# Altium PCB TELEX_CORE_LEFT_V2.0.PcbDoc
Units mil, origin at the board's own origin, x right, y up, seen from the top; angles counter-clockwise.
Board outline 1377.95 x 984.25 mil, 4 copper layers (Top Layer, GND, PWR, Bottom Layer), stack 23.756 mil thick; 122 components, 83 nets, 467 pads, 188 vias.
Unrouted connection lines stored in the file: 4.
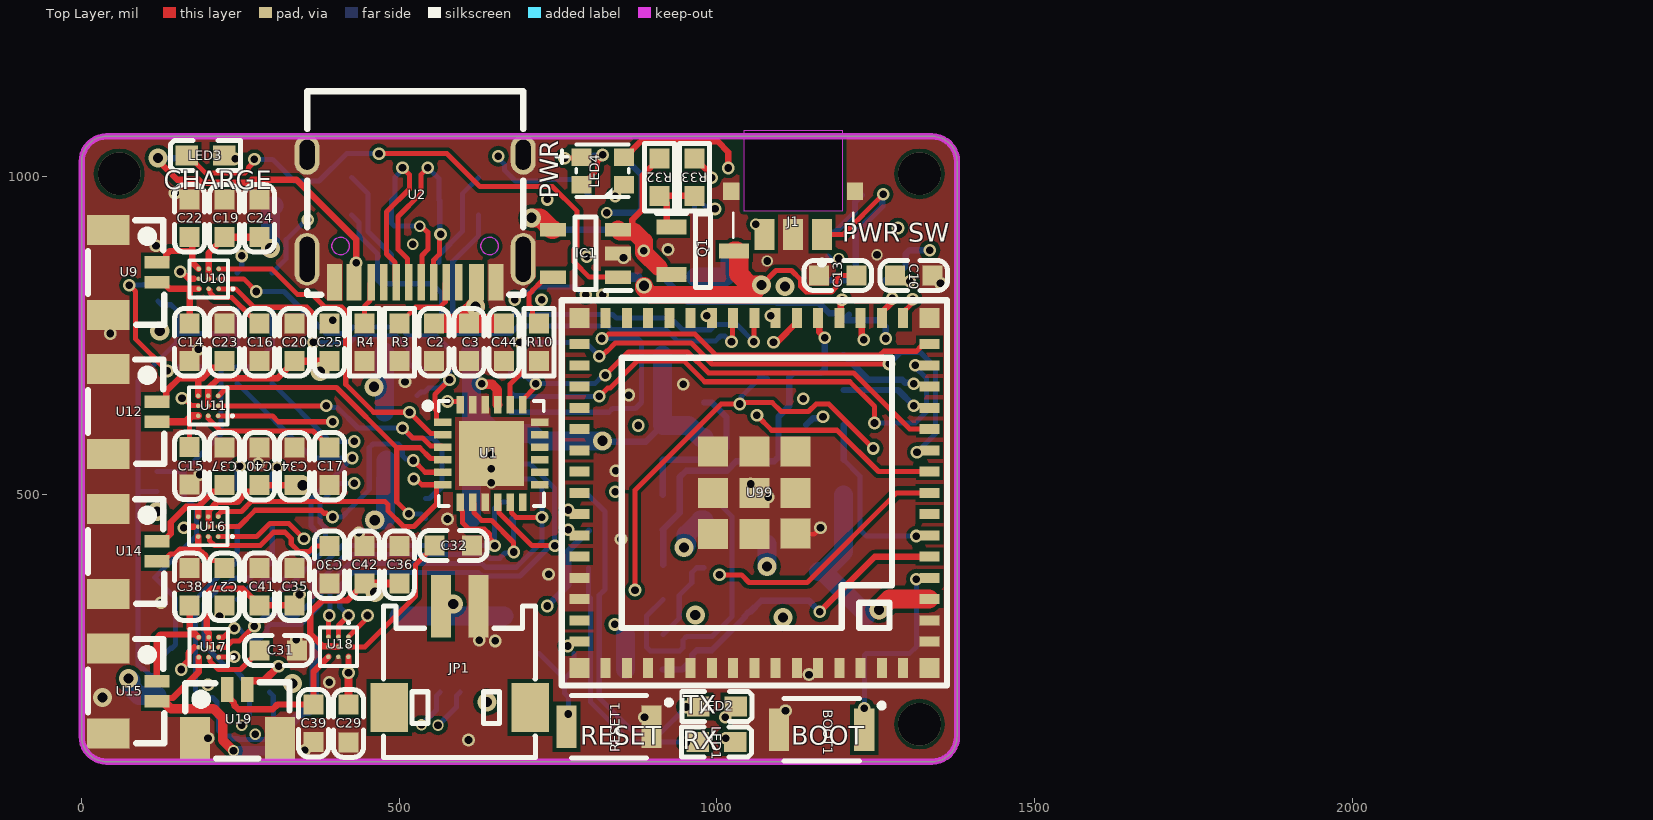
[diagram p0: Top Layer view]
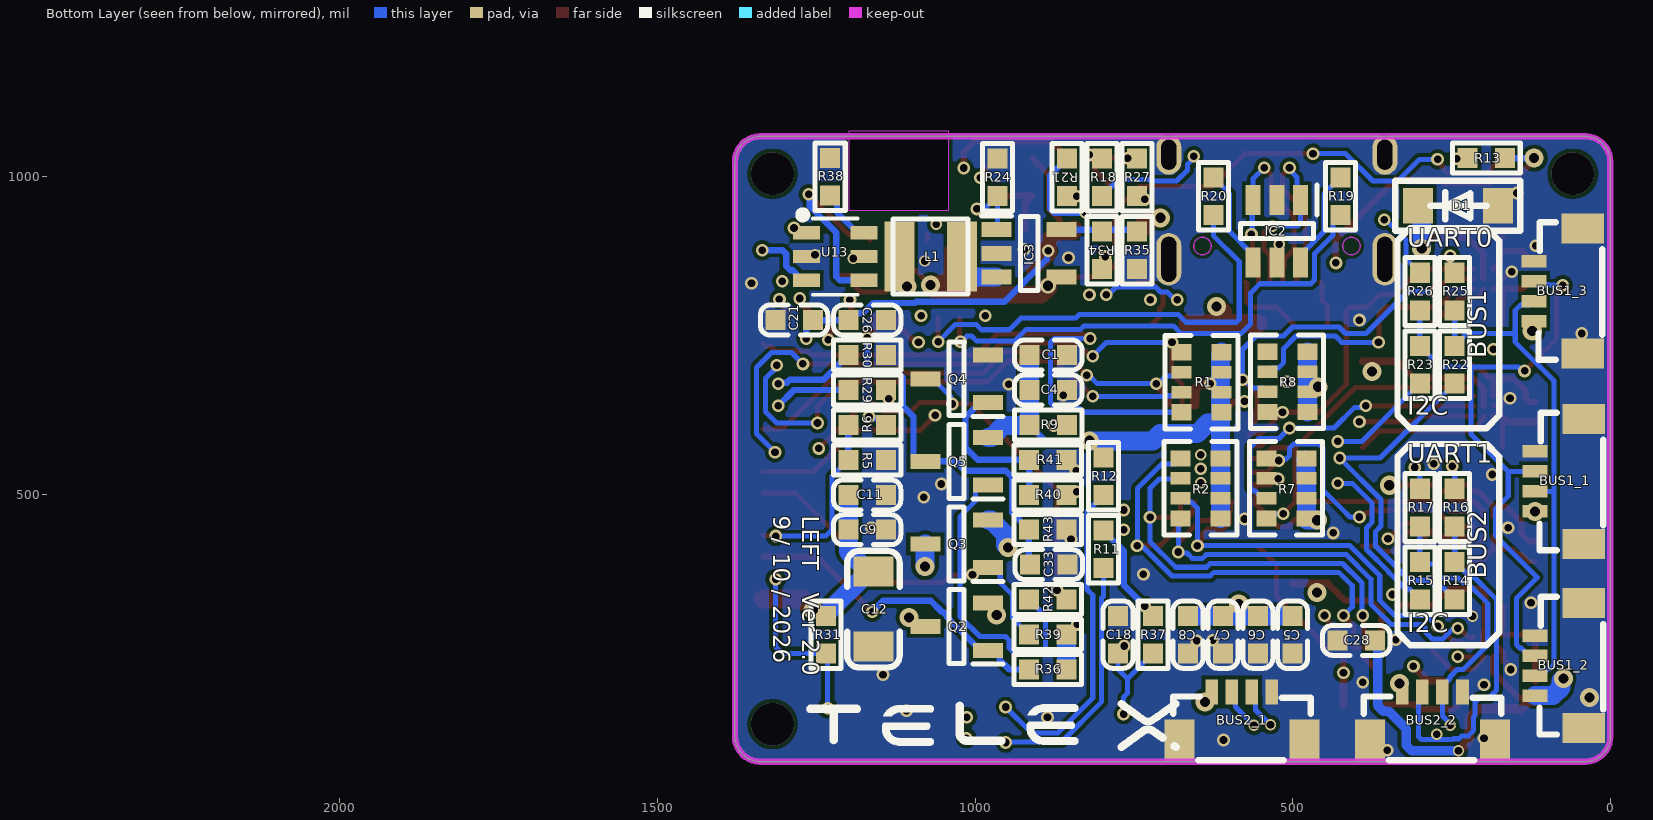
[diagram p1: Bottom Layer view, seen from below]
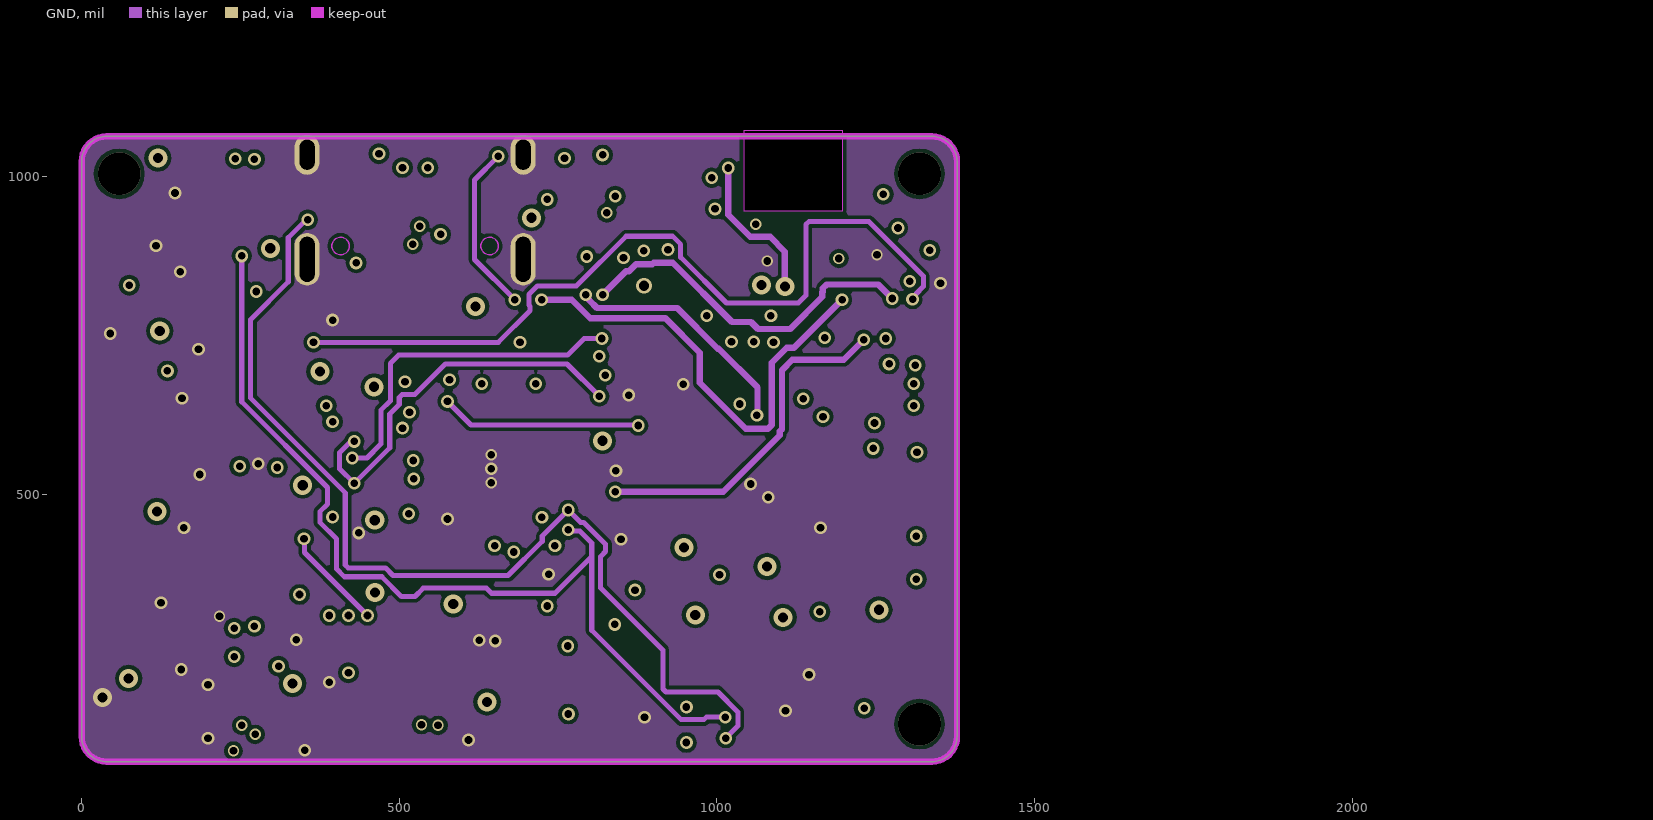
[diagram p2: GND]
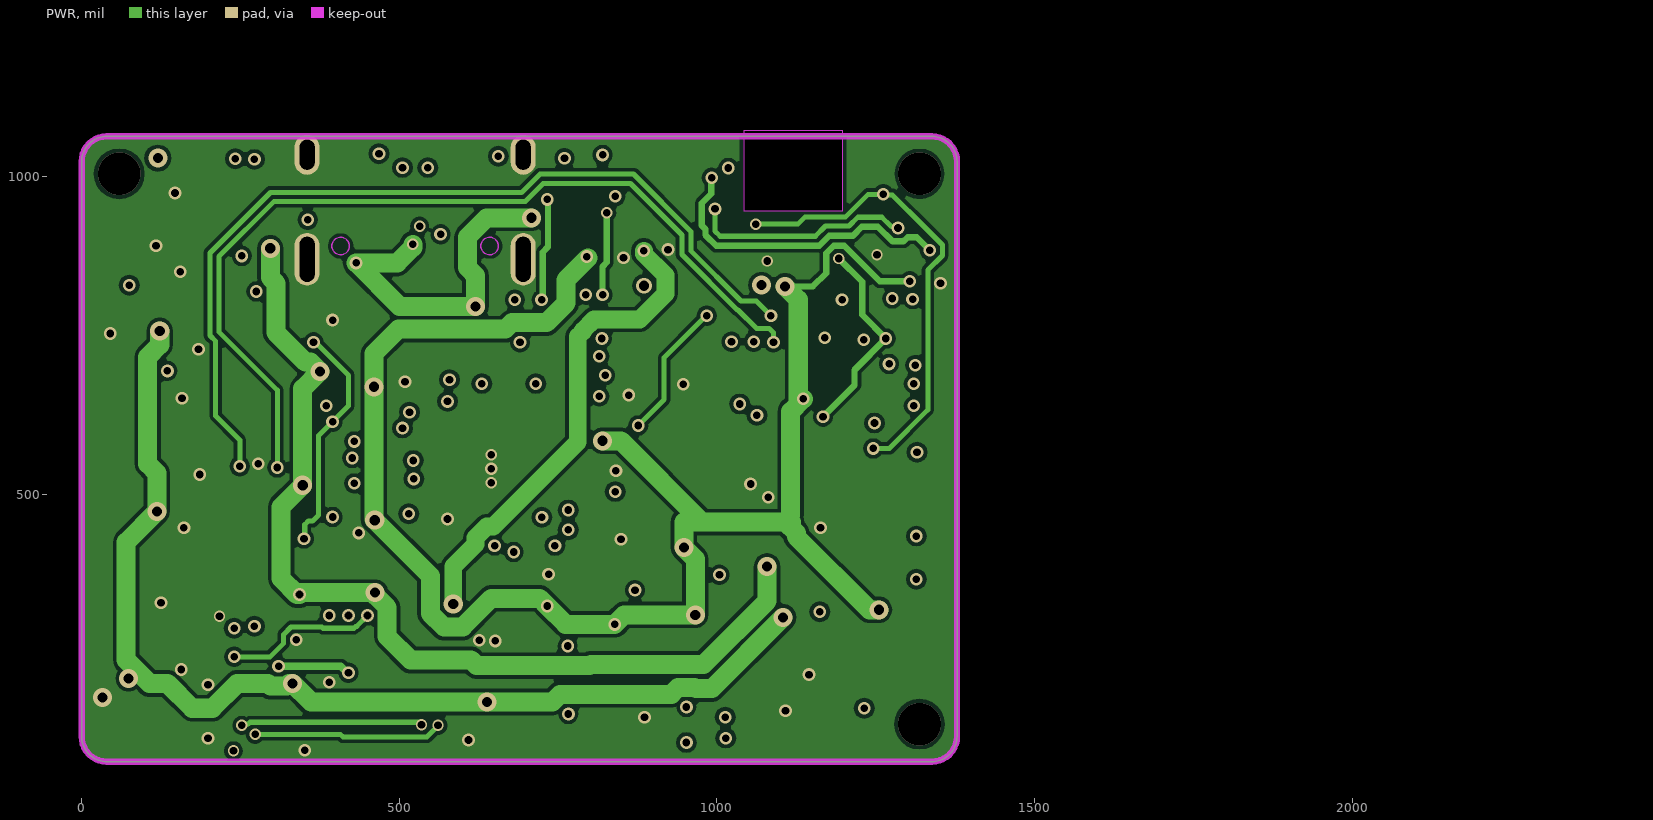
[diagram p3: PWR]
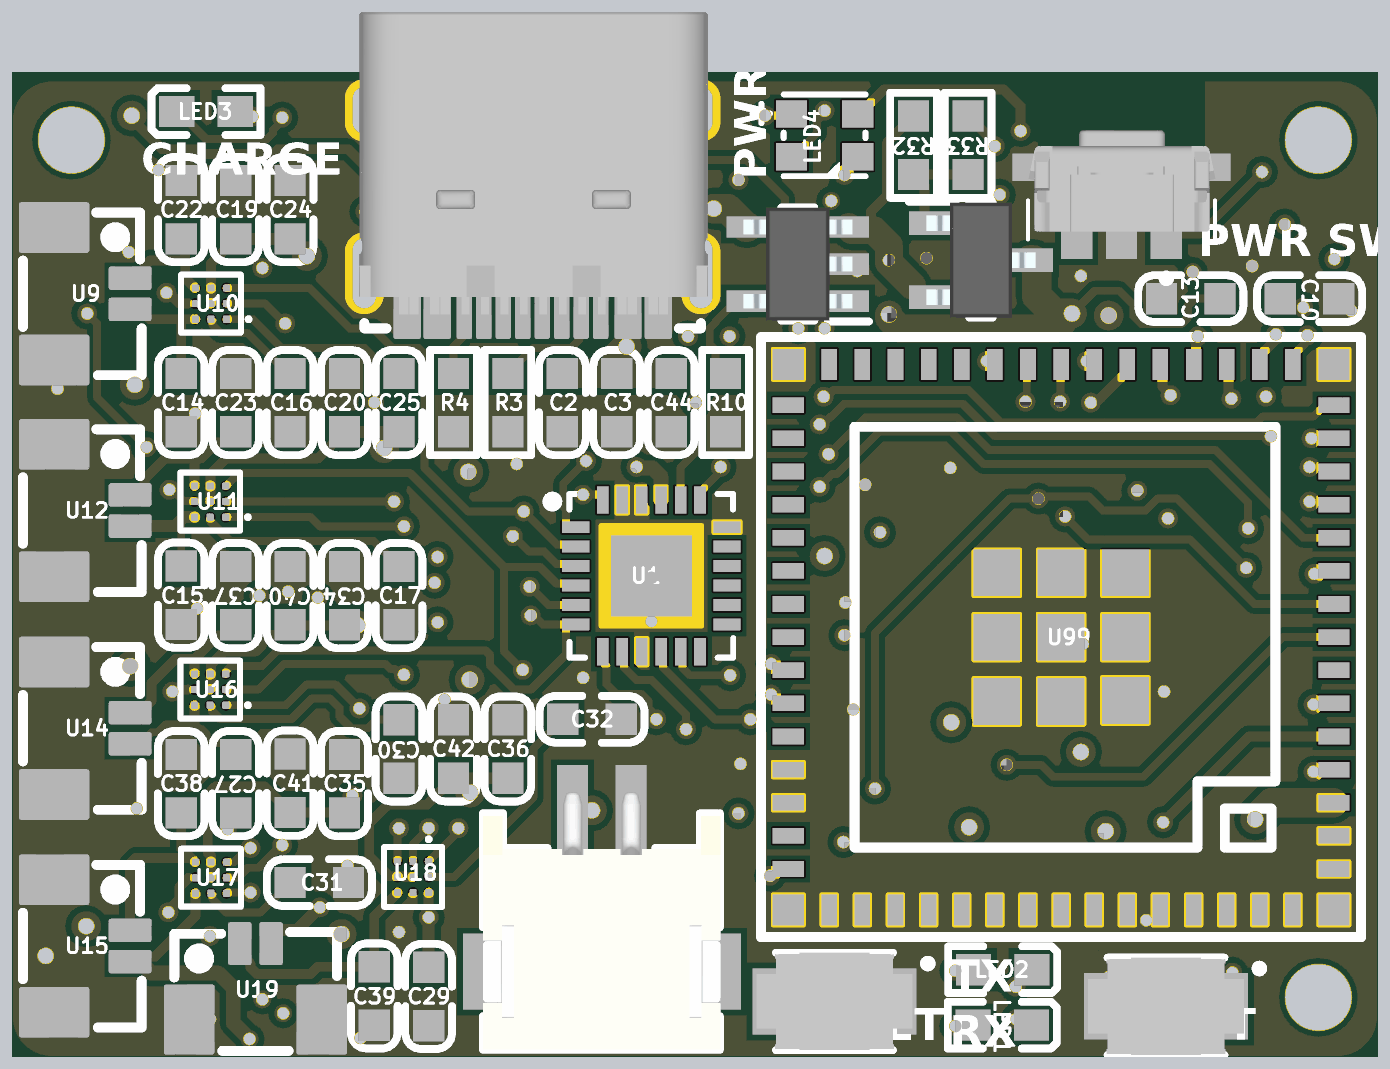
[diagram p4: 3D render of the assembled board from above, using the file's embedded part models]
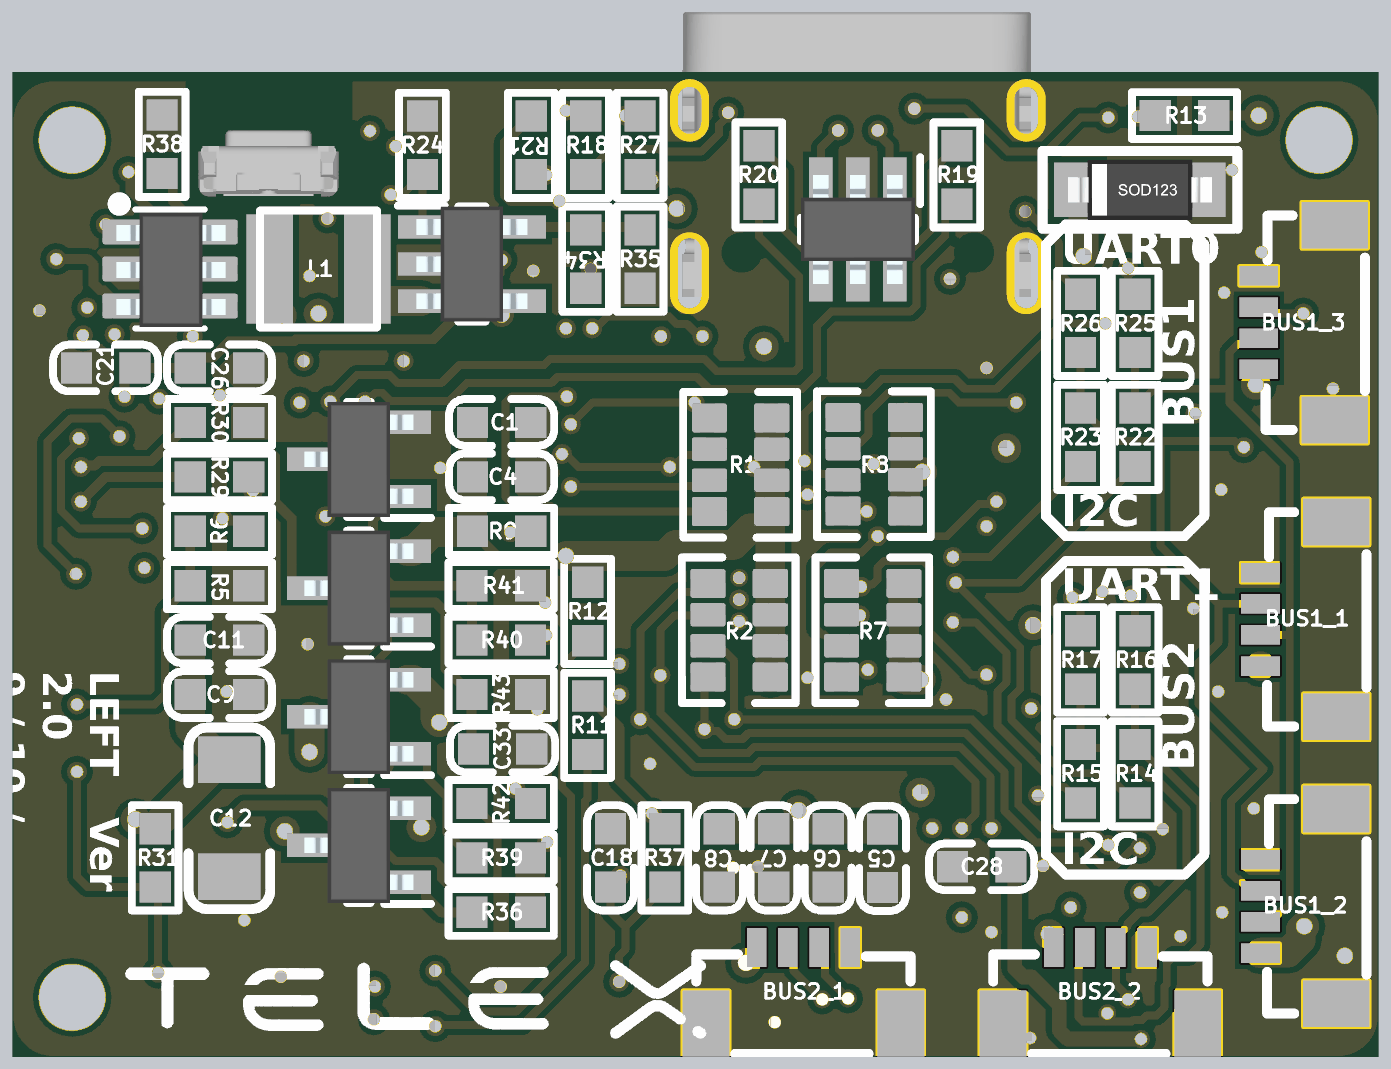
[diagram p5: 3D render of the assembled board from below, using the file's embedded part models]

## Layer stack, top to bottom
Top Solder: solder mask 0.4, Solder Resist, Dk 3.5
Top Layer: signal copper 1.4
Dielectric 2: prepreg 2.8, PP-006, Dk 4.1
GND: signal copper 1.378
Dielectric 1: dielectric 12.6, FR-4, Dk 4.8
PWR: signal copper 1.378
Dielectric 3: prepreg 2.8, PP-006, Dk 4.1
Bottom Layer: signal copper 1.4
Bottom Solder: solder mask 0.4, Solder Resist, Dk 3.5

## Board outline
39.37,79 cw(c39.37,118.37) 0,118.37 0,1023.88 cw(c39.37,1023.88) 39.37,1063.25 1338.58,1063.25 cw(c1338.58,1023.88) 1377.95,1023.88 1377.95,118.37 cw(c1338.58,118.37) 1338.58,79
cut-out: 1042,1072 1042,946 1198,946 1198,1072

## Design rules (kind name [scope] priority, off if disabled: settings)
Clearance [All] p1: gap=6 ignorepadtopadclearanceinfootprint=TRUE except(0: Arc-Text Track-Text SMDPad-Text THPad-Text Via-Text Fill-Text Poly-Text Region-Text Text-Text)
DiffPairsRouting [All] p1: maxlimit=10 minlimit=10 mostfreqgap=10 toplayer_minwidth=5 toplayer_maxwidth=15 toplayer_prefwidth=15 midlayer1_minwidth=5 midlayer1_maxwidth=15 midlayer1_prefwidth=15 midlayer2_minwidth=5 midlayer2_maxwidth=15 midlayer2_prefwidth=15 bottomlayer_minwidth=5 bottomlayer_maxwidth=15 bottomlayer_prefwidth=15 maxuncoupledlength=500
HoleToHoleClearance [All] p1: gap=0 allowstackedmicrovias=TRUE
MinimumSolderMaskSliver [All] p1: minsoldermaskwidth=0
PolygonConnect [All] p1: connectstyle=Direct reliefconductorwidth=10 reliefentries=4 polygonreliefangle="90 Angle" airgapwidth=10
RoutingVias [All] p1: holewidth=28 width=50 viastyle="Through Hole" minholewidth=28 minwidth=50 maxholewidth=28 maxwidth=50
SilkToSilkClearance [All] p1: silktosilkclearance=0
SilkToSolderMaskClearance [IsPad] p1: minsilkscreentomaskgap=0 clearancetoexposedcopper=TRUE
SolderMaskExpansion [All] p1: expansion=0 istentingtop=FALSE
SupplyNets "Schematic Supply Nets_5" [InNet('VDD')] p1: voltage=0.000
SupplyNets "Schematic Supply Nets_4" [InNet('VUSB')] p2: voltage=0.000
SupplyNets "Schematic Supply Nets_3" [InNet('VIN')] p3: voltage=0.000
SupplyNets "Schematic Supply Nets_2" [InNet('+3.3V')] p4: voltage=0.000
SupplyNets "Schematic Supply Nets_1" [InNet('VBAT')] p5: voltage=0.000
SupplyNets "Schematic Supply Nets" [InNet('GND')] p6: voltage=0.000
Width [All] p1: maxlimit=9999 minlimit=5 preferedwidth=10 minimp=50.000000 maximp=50.000000 favimp=50.000000
25 further rules are at their usual default settings.

## Classes and differential pairs
differential pair PROC: +PROC_P -PROC_N
differential pair D: +D_P -D_N

## Components (designator, comment, footprint, x,y, rotation, side; value= is the part's Value field where it differs from the comment)
BOOT1 "B3U-1000P" B3U-1000P 1165,129 r0 top
BUS1_1 "SUH08-4P" WAFER-SUH08-WT-4A-4P-P0.80 80,520 r90 bottom
BUS1_2 "SUH08-4P" WAFER-SUH08-WT-4A-4P-P0.80 80,230 r90 bottom
BUS1_3 "SUH08-4P" WAFER-SUH08-WT-4A-4P-P0.80 81.61,819.75 r90 bottom
BUS2_1 "SUH08-4P" WAFER-SUH08-WT-4A-4P-P0.80 580,150 r180 bottom
BUS2_2 "SUH08-4P" WAFER-SUH08-WT-4A-4P-P0.80 280,150 r180 bottom
C1 "0.1uF" C0603 885,719 r0 bottom
C2 "10nF" C0603 555,739 r90 top
C3 "100nF" C0603 610,739 r90 top
C4 "10uF" C0603 885,664 r0 bottom
C5 "22uF" C0603 500,278.53 r90 bottom
C6 "22uF" C0603 555,279 r90 bottom
C7 "100nF" C0603 610,279 r90 bottom
C8 "22uF" C0603 665,279 r90 bottom
C9 "100nF" C0603 1170,444 r0 bottom
C10 "22uF" C0603 1310,844 r180 top
C11 "10uF" C0603 1170,499 r0 bottom
C12 "100uF" C1206 1160,319 r90 bottom
C13 "10uF" C0603 1190,844 r180 top
C14 "100pF" C0603 170,739 r270 top
C15 "100pF" C0603 170,544.47 r270 top
C16 "0.1uF" C0603 280,739 r270 top
C17 "0.1uF" C0603 390,544 r270 top
C18 "1uF" C0603 775,279 r90 bottom
C19 "10uF" C0603 225,934 r270 top
C20 "10uF" C0603 335,739 r270 top
C21 "100nF" C0603 1285,774 r180 bottom
C22 "100pF" C0603 170,934 r270 top
C23 "100pF" C0603 225,739 r270 top
C24 "0.1uF" C0603 280,934 r270 top
C25 "0.1uF" C0603 390,739 r270 top
C26 "1uF" C0603 1170,774 r0 bottom
C27 "100pF" C0603 225,354 r270 top
C28 "100pF" C0603 400,270 r0 bottom
C29 "100pF" C0603 420,139 r270 top
C30 "0.1uF" C0603 390,389 r270 top
C31 "0.1uF" C0603 309.53,254 r0 top
C32 "0.1uF" C0603 585,419 r0 top
C33 "100nF" C0603 884,389 r0 bottom
C34 "10uF" C0603 335,544 r270 top
C35 "10uF" C0603 335,354 r270 top
C36 "10uF" C0603 500,389 r270 top
C37 "100pF" C0603 225,544 r270 top
C38 "100pF" C0603 170,354 r270 top
C39 "100pF" C0603 365,139.47 r90 top
C40 "0.1uF" C0603 280,544 r270 top
C41 "0.1uF" C0603 280,354.47 r270 top
C42 "0.1uF" C0603 445,389 r270 top
C44 "10uF" C0603 665,739 r90 top
D1 "SSxx" SOD-123FL 240,954 r0 bottom
IC1 "TP4054-42-SOT25-R" SOT95P280X100-5N 793,879 r180 top
IC2 "USBLC6-2SC6" SOT95P280X145-6N 525,914 r270 bottom
IC3 "SY8089AAC" SOT95P285X140-5N 915,879 r180 bottom
J1 "EVPAEDB2A" EVPAEJB2A 1120,929 r180 top
JP1 "HDR-1X2" ZH1.5-WS-2P 595,164 r0 top
L1 "2.2uH" L3030 1070,874 r180 bottom
LED1 "LED_RED" LED0603_RED 999.53,110 r0 top
LED2 "LED_GREEN" LED0603_GREEN 1000,166 r0 top
LED3 "LED_BLUE" LED0603_BLUE 195,1033 r180 top
LED4 "NH-B2020RGBA-HF" NH-B2020RGBA-HF 820,1009 r180 top
Q1 "AO3401A" SOT95P280X125-3N 978,883 r0 top
Q2 "AO3401A" SOT95P280X125-3N 1029.21,291.6 r0 bottom
Q3 "AO3401A" SOT95P280X125-3N 1029.21,421.6 r0 bottom
Q4 "AO3400A" SOT95P280X125-3N 1029.21,681.6 r0 bottom
Q5 "AO3401A" SOT95P280X125-3N 1029.21,551.6 r0 bottom
R1 "4.7kΩ*4" 0603*4 643.5,676.24 r90 bottom
R2 "4.7kΩ*4" 0603*4 645,509 r90 bottom
R3 "5.1K" R0603 500,739 r90 top
R4 "5.1K" R0603 445,739 r90 top
R5 "22K" R0603 1170,554 r180 bottom
R6 "10K" R0603 1170,609 r0 bottom
R7 "4.7kΩ*4" 0603*4 510,509 r90 bottom
R8 "4.7kΩ*4" 0603*4 508.5,676.76 r90 bottom
R9 "10K" R0603 885,609 r0 bottom
R10 "2K" R0603 720,739 r90 top
R11 "1K" R0603 798,413 r270 bottom
R12 "1K" R0603 798,528 r270 bottom
R13 "1K" R0603 195,1029 r0 bottom
R14 "0Ω" R0603 245,364 r90 bottom
R15 "0Ω" R0603 300,364 r90 bottom
R16 "0Ω" R0603 245,479 r90 bottom
R17 "0Ω" R0603 300,479 r90 bottom
R18 "160Ω" R0603 800,999 r90 bottom
R19 "22Ω" R0603 425,969 r90 bottom
R20 "22Ω" R0603 625,969 r90 bottom
R21 "160Ω" R0603 855,999 r270 bottom
R22 "0Ω" R0603 245,704 r90 bottom
R23 "0Ω" R0603 300,704 r90 bottom
R24 "100K" R0603 965,999 r270 bottom
R25 "0Ω" R0603 245,819 r90 bottom
R26 "0Ω" R0603 300,819 r90 bottom
R27 "120Ω" R0603 745,999 r270 bottom
R29 "10K" R0603 1170,664 r180 bottom
R30 "10K" R0603 1170,719 r180 bottom
R31 "10K" R0603 1235,279 r270 bottom
R32 "10K" R0603 910,999 r270 top
R33 "100Ω" R0603 965,999 r90 top
R34 "45.3K" R0603 800,884 r270 bottom
R35 "10K" R0603 745,884 r270 bottom
R36 "10K" R0603 885.47,224 r0 bottom
R37 "10K" R0603 720,279 r270 bottom
R38 "10K" R0603 1228,1000 r270 bottom
R39 "10K" R0603 885.47,279 r0 bottom
R40 "1K" R0603 885.47,499 r180 bottom
R41 "47K" R0603 885.47,554 r0 bottom
R42 "100K" R0603 885.47,334 r0 bottom
R43 "100K" R0603 885.47,444 r0 bottom
RESET1 "B3U-1000P" B3U-1000P 830,134 r0 top
U1 "TCA9548ARGER" TCA9548ARGER 645,564 r270 top
U2 "TYPE-C" TYPE-C-F 525,934 r180 top
U9 "SUH08-2P" WAFER-SUH08-WT-2A-2P-P0.80 80,849 r270 top
U10 "AW86234FCR" DSBGA-9_L1.4-W1.3-R3-C3-P0.40-BL 200,839 r90 top
U11 "AW86234FCR" DSBGA-9_L1.4-W1.3-R3-C3-P0.40-BL 199.25,639 r90 top
U12 "SUH08-2P" WAFER-SUH08-WT-2A-2P-P0.80 80,630 r270 top
U13 "UOV-K20" UOV-K20 1220,874 r270 bottom
U14 "SUH08-2P" WAFER-SUH08-WT-2A-2P-P0.80 80,410 r270 top
U15 "SUH08-2P" WAFER-SUH08-WT-2A-2P-P0.80 80,190 r270 top
U16 "AW86234FCR" DSBGA-9_L1.4-W1.3-R3-C3-P0.40-BL 199.25,449 r90 top
U17 "AW86234FCR" DSBGA-9_L1.4-W1.3-R3-C3-P0.40-BL 200,259 r90 top
U18 "AW86234FCR" DSBGA-9_L1.4-W1.3-R3-C3-P0.40-BL 404.25,259.75 r180 top
U19 "SUH08-2P" WAFER-SUH08-WT-2A-2P-P0.80 245,154 r0 top
U99 "ESP32-S3-MINI-1U" ESP32-S3-MINI-1U 1058.96,502.04 r180 top

## Footprints (in the part's own frame and the unit in brackets; to place one, negate y for a bottom-side part, rotate by r counter-clockwise, add the part's x,y. Pads: shape width x height; smd on the part's side, far side on the other; paste and mask are expansions set on the pad)
0603*4 [mm]
  rect 0.65x0.8 smd paste+0.051: 1(-1.2,-0.8) 4(1.2,-0.8) 5(1.2,0.8) 8(-1.2,0.8)
  rect 0.5x0.8 smd paste+0.051: 2(-0.4,-0.8) 3(0.4,-0.8) 6(0.4,0.8) 7(-0.4,0.8)
  silkscreen extent -1.87,-1.45 1.87,1.47
B3U-1000P [mm] "两脚小龟"
  rect 0.8x1.7 smd: 1(1.7,0) 2(-1.7,0)
  silkscreen extent -1.5,-1.25 2.49,1.25, body extent -2,-1.25 2,1.25, height 1.6
C0603 [mm] "Chip Capacitor, 2-Leads, Body 1.6x0.8mm, IPC Medium Density"
  rect 0.8x0.8 smd: 1(-0.75,0) 2(0.75,0)
  silkscreen extent -1.35,-0.6 1.35,0.6, body extent -1.26,-0.4 1.26,0.4, height 0.5
C1206 [mm] "Chip Capacitor, 2-Leads, Body 3.2x1.6mm, IPC Medium Density"
  rect 1.2x1.6 smd: 1(-1.5,0) 2(1.5,0)
  silkscreen extent -2.33,-1.05 2.33,1.05, body extent -1.6,-0.8 1.6,0.8, height 1
DSBGA-9_L1.4-W1.3-R3-C3-P0.40-BL [mm]
  round 0.184 smd paste-100 mask+0.051: A1(-0.4,-0.4) A2(-0.4,0) A3(-0.4,0.4) B1(0,-0.4) B2(0,0) B3(0,0.4) C1(0.4,-0.4) C2(0.4,0) C3(0.4,0.4)
  silkscreen extent -0.74,-1.02 0.74,0.77
ESP32-S3-MINI-1U [mm]
  rect 0.8x0.4 smd paste+0 mask+0.05: 1(-7,5.95) 2(-7,5.1) 3(-7,4.25) 4(-7,3.4) 5(-7,2.55) 6(-7,1.7) 7(-7,0.85) 8(-7,0) 9(-7,-0.85) 10(-7,-1.7) 11(-7,-2.55) 12(-7,-3.4) 13(-7,-4.25) 14(-7,-5.1) 15(-7,-5.95) 31(7,-5.95) 32(7,-5.1) 33(7,-4.25) 34(7,-3.4) 35(7,-2.55) 36(7,-1.7) 37(7,-0.85) 38(7,0) 39(7,0.85) 40(7,1.7) 41(7,2.55) 42(7,3.4) 43(7,4.25) 44(7,5.1) 45(7,5.95)
  rect 0.4x0.8 smd paste+0 mask+0.05: 16(-5.95,-7) 17(-5.1,-7) 18(-4.25,-7) 19(-3.4,-7) 20(-2.55,-7) 21(-1.7,-7) 22(-0.85,-7) 23(0,-7) 24(0.85,-7) 25(1.7,-7) 26(2.55,-7) 27(3.4,-7) 28(4.25,-7) 29(5.1,-7) 30(5.95,-7) 46(5.95,7) 47(5.1,7) 48(4.25,7) 49(3.4,7) 50(2.55,7) 51(1.7,7) 52(0.85,7) 53(0,7) 54(-0.85,7) 55(-1.7,7) 56(-2.55,7) 57(-3.4,7) 58(-4.25,7) 59(-5.1,7) 60(-5.95,7)
  rect 1.2x1.2 smd paste+0 mask+0.05: 61(-1.651,1.625) 61_1(0,1.65) 61_2(0,0) 61_3(-1.65,0) 61_4(1.65,0) 61_5(1.65,1.65) 61_6(-1.65,-1.65) 61_7(0,-1.65) 61_8(1.65,-1.65)
  rect 0.8x0.8 smd paste+0 mask+0.05: 62(-7,7) 63(-7,-7) 64(7,-7) 65(7,7)
  silkscreen extent -7.7,-7.7 7.7,7.7
EVPAEJB2A [mm]
  rect 0.8x1.25 smd: 1(-1.15,0.512) 2(0,0.512) 3(1.15,0.512)
  rect 0.65x0.7 smd: 4(-2.475,-1.213) 5(2.475,-1.213)
  silkscreen extent -2.4,-0.36 2.4,1.74, body extent -2.41,-2.16 2.39,0.44, height 0.97
L3030 [mm]
  rect 1.2x2.8 smd: 1(-1.25,0) 2(1.25,0)
  silkscreen extent -1.5,-1.5 1.5,1.5, body extent -1.5,-1.5 1.5,1.5, height 1.2
LED0603_BLUE [mm]
  rect 0.9x0.8 smd: 1(-0.75,0) 2(0.75,0)
  silkscreen extent -1.4,-0.6 1.4,0.6, body extent -1.3,-0.41 1.3,0.41, height 0.54
LED0603_GREEN [mm]
  rect 0.9x0.8 smd: 1(-0.75,0) 2(0.75,0)
  silkscreen extent -1.4,-0.6 1.4,0.6, body extent -1.3,-0.41 1.3,0.41, height 0.54
LED0603_RED [mm]
  rect 0.9x0.8 smd: 1(-0.75,0) 2(0.75,0)
  silkscreen extent -1.4,-0.6 1.4,0.6, body extent -1.3,-0.41 1.3,0.41, height 0.54
NH-B2020RGBA-HF [mm]
  rect 0.8x0.7 smd paste+0 mask+0.05: 1(-0.85,0.55) 2(0.85,0.55) 3(0.85,-0.55) 4(-0.85,-0.55)
  silkscreen extent -1.05,-1.05 1.85,1.05
R0603 [mm] "Chip Capacitor, 2-Leads, Body 1.6x0.8mm, IPC Medium Density"
  rect 0.8x0.8 smd: 1(-0.75,0) 2(0.75,0)
  silkscreen extent -1.35,-0.6 1.35,0.6, body extent -1.3,-0.4 1.3,0.4, height 0.4
SOD-123FL [mm]
  rect 1.2x1.4 smd: 1(-1.6,0) 2(1.6,0)
  silkscreen extent -2.5,-1 2.5,1, body extent -1.85,-0.77 1.85,0.78, height 1.35
SOT95P280X100-5N [mm]
  rect 1.05x0.55 smd: 1(-1.3,0.95) 2(-1.3,0) 3(-1.3,-0.95) 4(1.3,-0.95) 5(1.3,0.95)
  silkscreen extent -1.83,-1.45 0.43,1.48, body extent -1.4,-1.45 1.4,1.45, height 1
SOT95P280X125-3N [mm]
  rect 1.2x0.6 smd: 1(-1.25,0.95) 2(-1.25,-0.95) 3(1.25,0)
  silkscreen extent -1.85,-1.48 0.3,1.5, body extent -1.4,-1.48 1.4,1.48, height 1.25
SOT95P280X145-6N [mm]
  rect 1.2x0.6 smd: 1(-1.25,0.95) 2(-1.25,0) 3(-1.25,-0.95) 4(1.25,-0.95) 5(1.25,0) 6(1.25,0.95)
  silkscreen extent -1.85,-1.46 0.3,1.6, body extent -1.4,-1.46 1.4,1.46, height 1.45
SOT95P285X140-5N [mm]
  rect 1.2x0.6 smd: 1(-1.3,0.95) 2(-1.3,0) 3(-1.3,-0.95) 4(1.3,-0.95) 5(1.3,0.95)
  silkscreen extent -1.9,-1.48 0.35,1.5, body extent -1.43,-1.48 1.43,1.48, height 1.4
TCA9548ARGER [mm]
  rect 0.3x0.7 smd paste-100 mask+0.051: 1(-1.25,-1.942) 2(-0.75,-1.942) 3(-0.25,-1.942) 4(0.25,-1.942) 5(0.75,-1.942) 6(1.25,-1.942) 13(1.25,1.942) 14(0.75,1.942) 15(0.25,1.942) 16(-0.25,1.942) 17(-0.75,1.942) 18(-1.25,1.942)
  rect 0.7x0.3 smd paste-100 mask+0.051: 7(1.948,-1.25) 8(1.948,-0.75) 9(1.948,-0.25) 10(1.948,0.25) 11(1.948,0.75) 12(1.948,1.25) 19(-1.948,1.25) 20(-1.948,0.75) 21(-1.948,0.25) 22(-1.948,-0.25) 23(-1.948,-0.75) 24(-1.948,-1.25)
  rect 2.6x2.6 smd paste-100 mask+0.051: 25(0.001,-0.001)
  silkscreen extent -2.1,-2.67 2.1,2.1
TYPE-C-F [mm]
  oval 1x2.1 hole 0.6 slot 1.8 at 90 deg paste-2539.97: 13(-4.32,1.633) 14(4.32,1.633)
  oval 1x1.6 hole 0.6 slot 1.2 at 90 deg paste-2539.97: 15(-4.32,-2.547) 16(4.32,-2.547)
  rect 0.6x1.45 smd paste+0.051: A1B12(-3.225,2.547) A4B9(-2.45,2.547) B1A12(3.22,2.547) B4A9(2.45,2.547)
  rect 0.3x1.45 smd paste+0.051: A5(-1.25,2.547) A6(-0.25,2.547) A7(0.25,2.547) A8(1.25,2.547) B5(1.75,2.547) B6(0.75,2.547) B7(-0.75,2.547) B8(-1.75,2.547)
  Keep-Out Layer circle w0.003: c2.98,1.103 r0.35
  Keep-Out Layer circle w0.003: c-2.98,1.103 r0.35
  Keep-Out Layer region: 3.33,1.103 3.33,1.033 3.277,0.904 3.178,0.806 3.05,0.753 2.911,0.753 2.782,0.806 2.683,0.904 2.63,1.033 2.63,1.103 2.63,1.172 2.683,1.301 2.782,1.399 2.911,1.453 3.05,1.453 3.178,1.399 3.277,1.301 3.33,1.172 3.33,1.103 3.33,1.103
  Keep-Out Layer region: 3.33,1.103 3.33,1.033 3.277,0.904 3.178,0.806 3.05,0.753 2.911,0.753 2.782,0.806 2.683,0.904 2.63,1.033 2.63,1.103 2.63,1.172 2.683,1.301 2.782,1.399 2.911,1.453 3.05,1.453 3.178,1.399 3.277,1.301 3.33,1.172 3.33,1.103 3.33,1.103
  Keep-Out Layer region: -2.63,1.103 -2.63,1.033 -2.683,0.904 -2.782,0.806 -2.91,0.753 -3.05,0.753 -3.178,0.806 -3.277,0.904 -3.33,1.033 -3.33,1.103 -3.33,1.172 -3.277,1.301 -3.178,1.399 -3.05,1.453 -2.91,1.453 -2.782,1.399 -2.683,1.301 -2.63,1.172 -2.63,1.103 -2.63,1.103
  Keep-Out Layer region: -2.63,1.103 -2.63,1.033 -2.683,0.904 -2.782,0.806 -2.91,0.753 -3.05,0.753 -3.178,0.806 -3.277,0.904 -3.33,1.033 -3.33,1.103 -3.33,1.172 -3.277,1.301 -3.178,1.399 -3.05,1.453 -2.91,1.453 -2.782,1.399 -2.683,1.301 -2.63,1.172 -2.63,1.103 -2.63,1.103
  silkscreen extent -4.32,-5.08 4.32,3.05, body extent -4.5,-5.06 4.44,2.69, height 3.2
UOV-K20 [mil]
  rect 20.95x42.2 smd paste+2: 1(-37.4,-45.24) 2(0,-45.24) 3(37.4,-45.24) 4(37.4,45.24) 5(0,45.24) 6(-37.4,45.24)
  silkscreen extent -72,-57 60,35, body extent -57,-54 59,56, height 57
WAFER-SUH08-WT-2A-2P-P0.80 [mm]
  rect 0.5x1 smd paste+0.051: 1(-0.4,0.975) 2(0.4,0.975)
  rect 1.2x1.7 smd paste+0.051: 3(1.7,-0.975) 4(-1.7,-0.975)
  silkscreen extent -2.08,-1.78 2.09,1.27
WAFER-SUH08-WT-4A-4P-P0.80 [mm]
  rect 0.5x1 smd paste+0 mask+0.05: 1(-1.2,0.975) 2(-0.4,0.975) 3(0.4,0.975) 4(1.2,0.975)
  rect 1.2x1.7 smd paste+0 mask+0.05: 5(-2.5,-0.975) 6(2.5,-0.975)
  silkscreen extent -2.75,-1.75 2.75,0.8
ZH1.5-WS-2P [mm]
  rect 1.5x1.95 smd: 0(-2.818,0) 0_1(2.818,0)
  rect 0.8x2.5 smd: 1(-0.75,4.05) 2(0.75,4.05)
  silkscreen extent -3.05,-2 3.03,4.06, body extent -3.05,-2 3.05,4.6, height 3.75

## Part data
C1 C2 C3 C4 C5 C6 C7 C8 C9 C10 C11 C12 C13 C14 C15 C16 C17 C18 C19 C20 C21 C22 C23 C24 C25 C26 C27 C28 C29 C30 C31 C32 C33 C34 C35 C36 C37 C38 C39 C40 C41 C42 C44: library part CC, "瓷片电容", 品牌=muRata, 材质=X7R, 类别=电容, 精度=20%, 耐压=25V
D1: "肖特基二极管"
IC1: "Integrated Circuit", Manufacturer_Name="TOP POWER", Datasheet Link=http://images.100y.com.tw/pdf_file/38-TP-TP4054x.pdf, Height=1mm, Manufacturer_Part_Number=TP4054-42-SOT25-R
IC2: "Integrated Circuit", Manufacturer_Name=STMicroelectronics, Mouser Part Number=511-USBLC6-2SC6, Arrow Part Number=USBLC6-2SC6, Arrow Price/Stock=https://www.arrow.com/en/products/usblc6-2sc6/stmicroelectronics.html?utm_currency=USD&region=nac, Datasheet Link=https://www.st.com/resource/en/datasheet/usblc6-2.pdf, Height=1.45mm, Manufacturer_Part_Number=USBLC6-2SC6, Mouser Price/Stock=https://www.mouser.co.uk/ProductDetail/STMicroelectronics/USBLC6-2SC6?qs=po45yt2pPpu%2FhNIlwQdTlg%3D%3D
IC3: "Integrated Circuit", Manufacturer_Name=Silergy, Datasheet Link=https://datasheet.lcsc.com/szlcsc/Silergy-Corp-SY8089AAAC_C78988.pdf, Height=1.4mm, Manufacturer_Part_Number=SY8089AAC
J1: "Connector", Manufacturer_Name=Panasonic, Arrow Part Number=EVPAEDB2A, Arrow Price/Stock=https://www.arrow.com/en/products/evp-aedb2a/panasonic, Datasheet Link=https://industry.panasonic.com/ac/cdn/e/control/switch/light-touch/catalog/sw_lt_eng_4522s_side_eg.pdf, Height=1.75mm, Manufacturer_Part_Number=EVPAEDB2A
JP1: library part "Header 2", "2P接插件", BOM名称=2P接插件, 学习资源=www.ooocke.com, 版权归属=源创客
L1: library part LG, "功率电感", 品牌=顺络, 类别=电感, 精度=20%, 高度=2.0
LED1: "发光二极管（红）"
LED2: "发光二极管（绿）"
LED3: "发光二极管（蓝）"
LED4: "multiple-color LED"
Q1 Q2 Q3 Q5: "MOSFET (P-Channel)", Manufacturer_Name="Alpha & Omega Semiconductors", Arrow Part Number=AO3401A, Arrow Price/Stock=https://www.arrow.com/en/products/ao3401a/alpha-and-omega-semiconductor.html?utm_currency=USD&region=europe, Datasheet Link=http://www.aosmd.com/pdfs/datasheet/AO3401A.pdf, Height=1.25mm, Manufacturer_Part_Number=AO3401A
Q4: "MOSFET (N-Channel)", Manufacturer_Name="Alpha & Omega Semiconductors", Arrow Part Number=AO3400A, Arrow Price/Stock=https://www.arrow.com/en/products/ao3400a/alpha-and-omega-semiconductor?utm_currency=USD&region=nac, Datasheet Link=http://aosmd.com/res/data_sheets/AO3400A.pdf, Height=1.25mm, Manufacturer_Part_Number=AO3400A
R3 R4 R5 R6 R9 R10 R11 R12 R13 R14 R15 R16 R17 R18 R19 R20 R21 R22 R23 R24 R25 R26 R27 R29 R30 R31 R32 R33 R34 R35 R36 R37 R38 R39 R40 R41 R42 R43: library part R, "贴片电阻", 品牌=国巨, 材质=薄膜, 类别=电阻, 精度=1%

## Via types
v1: diameter 20, hole 12, Top Layer to Bottom Layer, tented both sides, 145 vias
v2: diameter 30, hole 16, Top Layer to Bottom Layer, tented both sides, 24 vias
v3: diameter 18, hole 12, Top Layer to Bottom Layer, tented both sides, 15 vias
v4: diameter 66.93, hole 66.93, Top Layer to Bottom Layer, tented both sides, 3 vias
v5: diameter 25, hole 16, Top Layer to Bottom Layer, tented both sides, 1 vias

## Nets (pads, with @x,y where several pads share a name; then routed paths per layer and width w, separated by ;. In a path a pad name is that pad's centre, name@x,y a point inside that pad or via, vN(x,y) a via of type N, cw(c..) or ccw(c..) an arc to the next point about the centre after c; other vN are vias at no path point)
+3.3V: C1.2 C4.2 C9.2 C10.2 C11.2 C12.2 L1.1 LED4.4 Q2.2 Q3.2 Q5.2 R1.1 R1.2 R1.3 R1.4 R2.1 R2.2 R2.3 R2.4 R7.1 R7.2 R7.3 R7.4 R8.1 R8.2 R8.3 R8.4 R9.2 R11.1 R12.1 R29.2 R31.1 R34.2 R36.1 R37.1 R39.1 U1.21 U99.3 | length 4778.3
  Top Layer w10: LED4.4@851.49,1030.65 LED4.4 855.43,1030.65 880.05,1055.28 1001.16,1055.28 1018,1038.44 v1(1018,1013.37)
  Top Layer w15: v1(630,674) 630.96,673.04 645.96,673.04 654.56,664.44 654.56,640.98 U1.21
  Top Layer w30: v2(1255,318) 1271.71,334.71 U99.3@1333.59,334.71
  GND w10: v1(1018,1013.37) 1018,939.72 1052.72,905 1083.7,905 1107,881.7 v2(1107,827)
  PWR w10: v2(1107,827) 1151,827 1172,848 1172,879.28 1183.72,891 1200.28,891 1256.28,835 v1(1303.65,835)
  PWR w30: v2@460,460.41 v2(460,669) 460,721 498.65,759.65 666.8,759.65 677.16,770 731.84,770 762.42,800.58 762.42,837.42 v1@797,872 ; v2(461.41,459) 549,371.41 549,312.09 570.09,291 599.91,291 644.91,336 721,336 v1(733,324) 762,295 v1(839,295) 854,310 v2(966,310) 966,398 v2(948,416) 948,456 977,456 ; v2(820,584) 849,584 977,456 ; v2(1107,827) 1128,806 v1@1128,650 ; 1108,456 1125,439 1125,433.16 1240.16,318 v2(1255,318) ; 1116,467.09 1116,630 v1(1136,650) ; 1117,456 977,456
  Bottom Layer w10: v1(733,324) 766,357 766,410.53 R11.1 ; v2(820,584) 821.75,582.25 887.78,582.25 R9.2
  Bottom Layer w30: v2(461.41,459) 475.74,459 476.3,459.56 477.76,459.56 478.5,460.3 R7.2 R7.3 479.25,525.5 479.25,553.29 R7.4@480,554.04 ; R8.1 R8.4 ; R1.4 612.01,722.02 613.5,720.53 613.5,612 ; R2.1 R2.2 R2.3 R2.4 613.5,612 ; v2(820,584) 720.32,584 709.12,595.2 650.55,595.2 633.76,612 613.5,612 ; R36.1 R39.1 ; C1.2 C4.2 R9.2 915.28,608.25 955.32,608.25 974.57,589 Q5.2 ; v2(948,416) 951.75,419.75 951.75,436.18 974.57,459 Q3.2 ; C12.2 C12.2@1167.87,378.06 ; C11.2 C9.2 1199.53,409.71 C12.2@1167.87,378.06 ; R31.1 1234.25,309.28 1234.25,311.68 C12.2@1167.87,378.06
  other v1: 795,874
BAT: R5.1 R6.2 U99.6 | length 289.2
  Top Layer w8: v1(1314,434) 1315.24,435.24 1332.42,435.24 U99.6@1333.66,436.48
  Bottom Layer w8: R5.1 1225.28,528.25 1225.28,444 1235.28,434 v1(1314,434)
  Bottom Layer w10: R5.1 R6.2
BOOT: BOOT1.1 R31.2 U99.4 | length 277.1
  Bottom Layer w8: v1(1232,163) 1232,246.47 R31.2 1303.47,249.47 1314,260 v1(1314,366)
BUS1_A: BUS1_1.2 BUS1_2.2 BUS1_3.2 R22.2 R25.1 | length 845.3
  Bottom Layer w8: BUS1_2.2 108.54,214.25 96.89,225.9 94.56,225.9 88.7,231.76 88.7,506 ; BUS1_1.2 90.45,504.25 88.7,506 ; BUS1_3.2 125.84,798.16 140.84,798.16 149.68,789.32 149.68,753 ; R25.1 R22.2 225.53,753 149.68,753 ; 88.7,506 88.7,678.33 149.68,739.32 149.68,753
BUS1_B: BUS1_1.3 BUS1_2.3 BUS1_3.3 R23.2 R26.1 | length 1037.2
  Top Layer w8: v1(75,829) 85.08,818.92 85.08,743.92 v1(135,694)
  Bottom Layer w8: v1(75,829) 97,829 97.65,829.65 114.16,829.65 BUS1_3.3 ; BUS1_2.3 128.23,245.74 139.89,257.4 142.21,257.4 148.07,263.26 148.07,335.93 115,369 181,435 181,476.6 160.74,496.85 160.74,535.74 ; BUS1_1.3 160.74,535.74 ; v1(135,694) 138.25,694 144.47,700.22 225.11,700.22 ; R26.1 R23.2 266.69,700.22 225.11,700.22 ; 160.74,535.74 219.25,594.25 219.25,694.36 225.11,700.22
BUS2_A: BUS2_1.2 BUS2_2.2 R14.2 R16.1 | length 908.2
  PWR w8: v3(273,122) 407.29,122 411.29,118 543.64,118 561,135.36 v3(561,136)
  Bottom Layer w8: R16.1 R14.2 225.69,374.22 219.31,374.22 179,333.91 179,191.72 190.72,180 205.91,180 212.91,173 212.91,151.51 215.2,149.22 215.2,128.09 223.69,119.6 233.46,119.6 238.06,115 246.87,115 248.37,113.5 297.31,113.5 302,118.19 302,168.01 301.59,168.43 301.59,182.54 BUS2_2.2 ; v3(561,136) 589.9,164.9 589.9,182.54 BUS2_1.2
BUS2_B: BUS2_1.3 BUS2_2.3 R15.2 R17.1 | length 778.2
  PWR w8: v3(252,136) 253.91,137.91 262.04,137.91 265.13,141 531,141 v3(535,137)
  Bottom Layer w8: v3(252,136) 252,138.71 264.26,150.96 264.26,198.23 252.6,209.89 252.6,212.21 240.85,223.96 231.75,223.96 193,262.72 193,328.11 225.11,360.22 231.49,360.22 239.05,367.78 264.89,367.78 270.75,373.64 270.75,383.75 276.94,389.94 296.41,389.94 R15.2 R17.1 ; v3(535,137) 558.41,160.41 558.41,182.54 BUS2_1.3
D_N: IC2.3 U2.A7 U2.B7 | length 399.9
  Top Layer w8: U2.A7 515.16,856.35 513.26,858.25 513.26,870.29 498,885.55 498,937 534,973 534,1003 v1(545,1014) ; U2.B7 553.69,834.55 553.69,868.36 563,877.67 563,906.47 v1@565,908.47
  Bottom Layer w8: v1(545,1014) 562.4,996.6 IC2.3 563.7,961.91 563.7,910.3 v1(565,909)
D_P: IC2.1 U2.A6 U2.B6 | length 447.3
  Top Layer w8: U2.B6 493.57,835.62 493.57,864.53 480,878.09 480,944.46 516,980.46 516,1003 v1(505,1014) ; v3(532,922) 534.71,922 543.85,912.86 545,912.86 545,885.13 535.69,875.82 535.69,834.55 U2.A6
  Bottom Layer w8: v1(505,1014) 505,1010.75 493.08,998.83 493.08,968.7 IC2.1 487.6,926.4 492,922 v3(532,922)
GND: BOOT1.2 BUS1_1.4 BUS1_1.5 BUS1_1.6 BUS1_2.4 BUS1_2.5 BUS1_2.6 BUS1_3.4 BUS1_3.5 BUS1_3.6 BUS2_1.4 BUS2_1.5 BUS2_1.6 BUS2_2.4 BUS2_2.5 BUS2_2.6 C1.1 C2.1 C3.1 C4.1 C5.1 C6.1 C7.1 C8.1 C9.1 C10.1 C11.1 C12.1 C13.2 C14.2 C15.2 C16.2 C17.2 C18.2 C19.1 C20.1 C21.1 C22.1 C23.1 C24.1 C25.1 C26.1 C27.2 C28.2 C29.2 C30.2 C31.2 C32.2 C33.1 C34.1 C35.1 C36.1 C37.1 C38.1 C39.1 C40.1 C41.1 C42.1 C44.1 D1.1 IC1.2 IC2.2 IC3.2 J1.2 J1.4 J1.5 JP1.2 Q4.2 R3.1 R4.1 R5.2 R10.1 R24.1 R30.2 R35.2 R38.1 R41.1 R43.1 RESET1.1 U1.9 U1.18 U1.22 U1.23 U1.25 U2.13 U2.14 U2.15 U2.16 U2.A1B12 U2.B1A12 U9.3 U9.4 U10.B3 U11.B3 U12.3 U12.4 U13.2 U14.3 U14.4 U15.3 U15.4 U16.B3 U17.B3 U18.B3 U19.3 U19.4 U99.1 U99.2 U99.42 U99.43 U99.46 U99.47 U99.48 U99.49 U99.50 U99.51 U99.52 U99.53 U99.54 U99.55 U99.56 U99.57 U99.58 U99.59 U99.60 U99.61 U99.61_1 U99.61_2 U99.61_3 U99.61_4 U99.61_5 U99.61_6 U99.61_7 U99.61_8 U99.62 U99.63 U99.64 U99.65 | length 170
  Top Layer w7.5: J1.2@1120,899.98 J1.2 ; U99.61@1122.96,437.07 1153.07,437.07 v1(1163,447)
  Top Layer w8: v1(158,651) 161.25,651 172.5,639.75 U11.B3@184.25,639.75
  Top Layer w10: v1(155,850) 157.71,850 168.45,839.25 176.87,839.25 ; v1(157,224) 157,226.71 168.25,237.96 168.25,249.88 177.25,258.87 ; v1(161,447) 162.91,448.91 176.54,448.91 176.62,449
  other v1: 351,97 609,113 199,116 886,149 1108,159 199,200 390,204 1145,216 651,269 626,270 338,271 125,329 735,374 849,429 436,439 576,461 1081,495 1053,516 186,531 841,537 645,540 278,548 861,656 947,673 509,677 184,728 45,753 395,774 1352,832 853,872 923,885 117,891 147,974
  other v2: 33,180
  other v3: 217,308 645,518 645,562 1079,867 1252,877
HP_SCL: R1.6 U1.19 U99.11 | length 778.9
  Top Layer w8: U1.19 694.21,648.58 715,669.37 v1(715,674) ; v1(824,687) 860.88,723.88 953.72,723.88 986.61,691 1215,691 1303.57,602.43 U99.11@1333.59,602.43
  Bottom Layer w8: R1.6 680.84,686.15 699.61,686.15 711.75,674 807.75,674 820.75,687 v1(824,687)
HP_SDA: R1.5 U1.20 U99.10 | length 953.3
  Top Layer w8: U1.20 674.53,673.36 690.75,689.58 690.75,738.25 v1(690,739) ; v1(815,717) 818.25,717 826.25,725 827.28,725 840.17,737.88 959.52,737.88 992.41,705 v1(1271,705)
  Bottom Layer w8: v1(690,739) 793,739 v1(815,717) ; v1(1271,705) 1289,723 1320.28,723 1344,699.28 1344,595 v1(1315,566)
IMU: BUS1_1.1 BUS1_2.1 BUS1_3.1 BUS2_1.1 BUS2_2.1 Q2.3 | length 1767.6
  PWR w30: v2(123,757) 123,735 104,716 104,547.75 118.39,533.37 v2(118.39,472.75) 70,424.37 70,239 107,202 135.16,202 174.16,163 205.84,163 244.84,202 293.16,202 297.16,198 322.84,198 326.84,202 v2(332,202) 361,173 741.47,173 753.4,184.93 928.09,184.93 939.16,196 964.84,196 966.99,193.85 991.85,193.85 v2(1104,306)
  Bottom Layer w30: v2(74,210) 77.7,206.3 77.7,195.71 90,183.41 117.73,183.41 BUS1_2.1
  other v2: 638,173
IMU_CTRL: Q2.1 R36.2 U99.5 | length 511.8
  Top Layer w10: v1(1162,315) 1248.64,401.64 U99.5@1333.59,401.64
  Bottom Layer w10: R36.2 945.75,224 961.38,239.63 961.38,247.39 968.19,254.2 991.81,254.2 1043.8,306.19 1043.8,307.97 1050.25,314.41 1052.02,314.41 1069.61,332 1145,332 v1(1162,315)
KEY: J1.1 J1.3 Q4.3 R42.1 U13.4 | length 1768.6
  Top Layer w8: v1(871,349) 871,506.35 1006.65,642 v1(1036,642) 1038,644 1087.13,644 1101.13,630 1144.28,630 1156.28,642 1176,642 v1(1246,572) ; J1.3@1074.72,899.98 J1.3 ; J1.1@1165.28,899.98 J1.1 1198.84,908.84 v1(1262,972)
  PWR w8: v3(1061,925) 1127.42,925 1138.42,936 1202.14,936 1238.14,972 v1(1262,972) 1262.91,971.09 1276.2,971.09 1326,921.28 1355,892.28 1355,875.72 1332,852.72 1332,632.72 1271.28,572 v1(1246,572)
  Bottom Layer w8: v1(1036,642) 1038.3,644.3 1038.3,653.28 1066.61,681.6 Q4.3
  Bottom Layer w10: Q4.3@1067,688.41 1073.81,681.6 Q4.3 ; U13.4 1212.74,836.6 1218.6,842.46 1218.6,911.89 1260.09,953.38 1260.09,970.09 v1(1262,972)
KEY_STATE: C33.2 Q5.3 R43.2 U99.20 | length 598.3
  Top Layer w10: U99.20@1158.47,779 1161.34,776.13 1161.34,755.36 1169.6,747.1 v1(1169.6,746.42)
  Bottom Layer w10: C33.2@915.47,389 915.47,443.53 R43.2 941.75,470.75 941.75,526.93 951.82,537.01 1016.01,537.01 1030.6,551.6 Q5.3 1090.24,551.6 1097.05,558.41 1097.05,622.05 1113.72,638.72 1113.72,684.3 1120.17,690.75 1163.75,690.75 1169.6,696.61 v1(1169.6,746.42)
LED_BLUE: R18.1 U99.9 | length 1256.2
  Top Layer w8: v1(1063,624) 1086.38,600.62 1189.09,600.62 1254.22,535.5 U99.9@1333.59,535.5
  GND w8: v1(656,1032) 618.54,994.54 618.54,869.46 v1(682,806)
  GND w10: v1(793.42,814) 793.42,811.29 799,805.71 799,805.3 811.3,793 937.3,793 1001.3,729 1003,729 1064,668 1064,625 v1(1063,624)
  Bottom Layer w8: v1(656,1032) 656,1028.75 665.39,1019.37 665.39,1010.18 682.78,992.79 722.68,992.79 725.11,995.22 774.25,995.22 R18.1 ; v1(682,806) 685.25,806 697.63,818.38 708.1,818.38 715.72,826 778.17,826 790.17,814 v1(793.42,814)
LED_GREEN: R27.2 U99.19 | length 922.1
  Top Layer w10: v1(724,806) v1@726.71,806 ; U99.19@1191.91,777.68 1195.09,780.86 1195.09,804.09 v1(1197,806)
  GND w10: v1(724,806) 771.72,806 800.72,777 919,777 973.15,722.85 973.15,675.15 1045.3,603 1080.51,603 1086.37,608.86 1086.37,706.67 1110,730.3 1121.3,730.3 v1(1197,806)
  PWR w10: v1(724,806) 725.76,807.76 725.76,880.8 734,889.04 734,963 v1(733,964)
LED_RED: R21.1 U99.17 | length 885.2
  Top Layer w10: U99.17@1258.79,777.63 1258.79,785.5 1274.09,800.8 1274.09,806.09 v1(1276,808)
  GND w10: v1(820,814) 857,851 861.7,851 872.7,862 898.35,862 900.35,864 930.7,864 1023.7,771 1053.7,771 1064.7,760 1115.37,760 1166,810.63 1166,817.7 1166.79,818.48 1166.79,824.14 1172.64,830 1254,830 v1(1276,808)
  PWR w10: v1(820,814) 820,858.23 826.72,864.95 v3(826.72,942.72)
  Bottom Layer w10: v1(820,814) v1@821.91,815.91 ; v3(826.72,942.72) 875.3,942.72 881.75,949.17 881.75,1001.78 R21.1
LP_SCL: R1.8 R14.1 R22.1 U99.15 | length 2005.8
  Top Layer w8: v1(819,745) 822.25,745 829.13,751.88 965.32,751.88 998.2,719 1256.72,719 1262.72,725 1314,725 1321.42,732.42 1329.72,732.42 U99.15@1333.59,736.29
  GND w8: v1(426,557) 449.2,557 471,578.8 471,632.08 486,647.08 486,706 499,719 765,719 791,745 v1(819,745)
  Bottom Layer w8: R14.1 264.31,353.78 273.67,353.78 284.44,364.55 316.67,364.55 335,382.89 335,383.6 369.7,418.3 369.7,421.42 370,421.72 370,440.92 361,449.92 361,491.64 426,556.64 v1(426,557) 362.47,557 R22.1 ; R1.8 829.83,629 835.58,634.75 871.86,634.75 881.22,644.11 881.22,738.89 875.11,745 v1(819,745)
LP_SDA: R1.7 R15.1 R23.1 U99.14 | length 1863.1
  Top Layer w8: v1(815,654) 828,667 832.28,667 875.17,709.88 947.93,709.88 980.81,677 1209.2,677 1248,638.2 v1(1248,612)
  GND w8: v1(429,583) 426.7,580.7 421.42,580.7 406,565.28 406,540 v1(429,517) 485,573 485,626.28 500,641.28 500,652.31 504.69,657 524.49,657 572.49,705 764,705 v1(815,654)
  Bottom Layer w8: R15.1 316.08,350.55 322.46,350.55 349,377.09 349,377.8 384,412.8 384,446.72 375,455.72 375,485.85 406.15,517 v1(429,517) ; R23.1 391.47,583 v1(429,583) ; R1.7 680.54,654.95 702.75,654.95 703.7,654 v1(815,654) ; v1(1248,612) 1312.31,612 1330,629.69 1330,682.28 1312,700.28 v1(1312,703)
M0_N: C22.2 U9.1 U10.C3 | length 122.8
  Top Layer w10: U9.1 128.23,864.75 133.07,869.59 133.07,876.87 138.93,882.72 174,882.72 ; C22.2 174,900.47 174,882.72 ; U10.C3@184,854.75 174,864.75 174,882.72
M0_P: C14.1 U9.2 U10.A3 | length 125.9
  Top Layer w10: U9.2 128.23,833.26 138.23,823.26 161.24,823.26 172.75,823.25 ; C14.1 170,820.5 172.75,823.25 ; U10.A3 172.75,823.25
M1_N: C23.2 U11.C3 U12.1 | length 168.5
  Top Layer w10: U12.1 128.23,645.75 133.07,650.59 133.07,662.37 153.42,682.72 182,682.72 ; U11.C3 183.5,681.22 182,682.72 ; C23.2 214.25,698.72 206.3,698.72 190.3,682.72 182,682.72
M1_P: C15.1 U11.A3 U12.2 | length 115
  Top Layer w8: C15.1 170,620.38 172.87,623.25
  Top Layer w12: U12.2 163.88,614.26 170,620.38 ; 172.87,623.25 U11.A3@183.25,623.25
M2_N: C37.2 U14.1 U16.C3 | length 169.4
  Top Layer w10: U14.1 128.23,425.75 140,437.52 140,455.7 164.43,480.13 183.5,480.13 ; U16.C3 183.5,480.13 ; C37.2 214.25,503.72 207.1,503.72 183.5,480.13
M2_P: C27.1 U14.2 U16.A3 | length 149.3
  Top Layer w8: U14.2 128.23,394.26 139.88,405.91 146.74,405.91 154.8,413.96 183.5,413.96 188.19,409.28 189.89,409.28 195.75,403.42 195.75,399 199.47,395.28 213.25,395.28 C27.1
  Top Layer w10: 183.5,413.96 U16.A3
M3_N: C38.2 U15.1 U17.C3 | length 186.7
  Top Layer w10: U15.1 118.39,273.14 124.24,279 179.75,279 ; C38.2 170,288.75 179.75,279 ; U17.C3@184,274.75 179.75,279
M3_P: C28.1 U15.2 U17.A3 | length 558.1
  Top Layer w10: U15.2 123.23,179.1 143.24,179.1 184.25,220.11 U17.A3
  Top Layer w15: U15.2 128.23,174.26 139.91,162.58 207.28,162.58 222.5,147.36 222.5,112.5 v3(239,96)
  Bottom Layer w15: v3(239,96) 312.71,96 321.5,104.79 321.5,130.87 349.21,158.58 357.71,158.58 366.5,167.37 366.5,266.03 C28.1
M4_N: C39.2 U18.C3 U19.1 | length 244.2
  Top Layer w10: U19.1 229.25,182.54 239.9,171.89 239.9,168.14 246.34,161.7 300.98,161.7 308.28,169 C39.2 365,220.5 U18.C3
M4_P: C29.1 U18.A3 U19.2 | length 259.8
  Top Layer w10: v1(420,219) U18.A3
  Top Layer w12: U19.2 260.74,202.23 264.58,206.07 287.07,206.07 v1(310,229) ; C29.1 v1(420,219)
  PWR w12: v1(310,229) 407.84,229 417.84,219 v1(420,219)
NetC16_1: C16.1 U10.A2 | length 105
  Top Layer w8: U10.A2 201.75,821.5 201.75,817.45 209.95,809.25 236.66,809.25 265.64,780.28 268.25,780.28 C16.1
NetC17_1: C17.1 U11.A2 | length 213.7
  Top Layer w8: U11.A2 199.25,619.2 219.18,599.28 364.25,599.28 C17.1
NetC30_1: C30.1 U16.A2 | length 228.5
  Top Layer w8: U16.A2@199.25,433.25 201,431.5 201,427.45 209.2,419.25 281.3,419.25 302.05,440 320.2,440 330,430.2 330,421.72 341.72,410 358.28,410 366.94,418.65 389.87,418.65 C30.1
NetC31_1: C31.1 U17.A2 | length 102.8
  Top Layer w8: U17.A2 201.75,241.5 201.75,237.45 215.2,224 250,224 C31.1
NetC32_1: C32.1 U18.A2 | length 230.5
  Top Layer w8: U18.A2 445.91,259.75 525.75,339.58 525.75,389.28 C32.1
NetIC1_1: IC1.1 LED3.2 | length 869.4
  Top Layer w8: LED3.2 167.44,1033 195.17,1005.28 256.95,1005.28 262.61,1010.93 262.61,1014.36 272,1023.75 v1(272,1027) ; v1(468,1036) 575,1036 627,984 741.28,984 780,945.28 780,890 775,885 775,865.72 799.12,841.6 IC1.1
  Bottom Layer w8: v1(272,1027) 300.52,1027 334.73,992.79 373.63,992.79 416.83,1036 v1(468,1036)
NetIC1_5: IC1.5 R10.2 | length 108.9
  Top Layer w8: R10.2 710,778.53 710,791.72 704,797.72 704,814.28 710,820.28 710,821.01 723.76,834.77 741.99,834.77 IC1.5@748.82,841.6
NetIC2_4: IC2.4 R20.2 | length 159.7
  Bottom Layer w8: IC2.4 562.4,876.6 599.25,913.45 599.25,972.78 R20.2
NetIC2_6: IC2.6 R19.2 | length 159.7
  Bottom Layer w8: R19.2 450.75,972.78 450.75,913.45 487.6,876.6 IC2.6
NetIC3_3: IC3.3 L1.2 | length 82
  Bottom Layer w30: IC3.3 1012.17,841.6 1020.79,850.22 L1.2
NetIC3_5: IC3.5 R34.1 R35.1 | length 120
  Bottom Layer w10: R35.1 747.87,916.4 IC3.5
NetLED1_1: LED1.1 R11.2 | length 389.2
  Bottom Layer w8: R11.2 798,339.24 800.75,336.49 800.75,173.25 864,110 951,110 v1(952,109)
NetLED2_1: LED2.1 R12.2 | length 510.9
  Bottom Layer w8: R12.2 823.75,472.72 823.75,350 814.75,341 814.75,179.05 869.8,124 911,124 v1(952,165)
NetLED3_1: LED3.1 R13.2
  other v1: 242,1028
NetLED4_1: LED4.1 R21.2
  other v1: 840,969
NetLED4_2: LED4.2 R18.2 | length 83.9
  Top Layer w8: LED4.2 788.51,987.35 812.29,1011.13 812.29,1023.31 820,1031.03 v1(820,1034)
  Bottom Layer w8: R18.2 805.47,1034 v1(820,1034)
NetLED4_3: LED4.3 R27.1 | length 27.2
  Top Layer w8: v1(760,1029) 784.89,1029 LED4.3
NetQ1_1: Q1.1 R32.2 R33.1 | length 112.5
  Top Layer w10: Q1.1@920.79,916.4 920.79,958.68 R32.2 R33.1
NetQ4_1: Q4.1 R40.1 R41.2 | length 255.5
  Bottom Layer w10: R40.1 R41.2 995.99,554 1015,573.01 1015,621.01 991.81,644.2 Q4.1
NetQ5_1: Q5.1 R42.2 | length 484.1
  Bottom Layer w8: R42.2 889.25,308.25 889.25,259.11 895.11,253.25 941.69,253.25 946.38,257.94 946.38,270.15 952.24,276.01 992.41,276.01 1024,307.6 1024,464.58 999.62,488.95 999.62,506.39 991.81,514.2 Q5.1
NetR3_2: R3.2 U2.A5 | length 118.2
  Top Layer w8: R3.2 525.75,794.28 563.69,794.28 572.31,802.89 572.31,831.81 U2.A5
NetR4_2: R4.2 U2.B5 | length 69.8
  Top Layer w8: R4.2 445,795.67 454.2,804.87 454.2,831.8 U2.B5
NetR38_2: R38.2 U13.6 | length 87.4
  Bottom Layer w10: U13.6 1185.39,911.4 1217.25,943.26 1217.25,959.72 R38.2
OFF_FLAG: R33.2 U13.3 | length 637.3
  Top Layer w10: R33.2 990.09,1003.44 990.09,999.91 v1(992,998)
  PWR w10: v1(992,998) 991.3,997.3 991.3,973 976,957.7 976,923 982,917 982,907.85 998.85,891 1161.09,891 1177.09,907 1214.15,907 1228.01,920.86 1253.44,920.86 1276.3,898 1293.7,898 1300.17,904.47 1314.53,904.47 v1(1335,884)
  Bottom Layer w10: U13.3 1275.87,836.6 1281.34,842.07 1281.34,846.67 1287.2,852.53 1290.9,852.53 1297.34,858.97 1297.34,878.14 1303.2,884 v1(1335,884)
ON_FLAG: IC3.1 R24.2 U13.1 | length 439.7
  PWR w8: v1(997,949) 997,914.06 1005.06,906 1154.88,906 1170.88,922 1207.94,922 1221.8,935.86 1259.66,935.86 1273.2,922.31 1274,922.31 1275.02,921.3 1282.7,921.3 v1(1285,919)
  Bottom Layer w8: IC3.1 965,917.58 R24.2 983.18,951.3 994.7,951.3 v1(997,949)
POWER_CTRL: R40.2 U99.18 | length 584.9
  Top Layer w10: U99.18@1225.33,777.63 1228.2,774.76 1228.2,748.5 1231,745.71 v1(1231,743)
  GND w10: v1(840,504) 1010,504 1099,593 1099,598.86 1102.37,602.23 1102.37,695.26 1118.78,711.67 1199.67,711.67 v1(1231,743)
PROC_N: R20.1 U99.23 | length 724.5
  Top Layer w8: v1(1058,740) 1058.48,740.48 1058.48,777.15 U99.23@1058,777.63
  Bottom Layer w8: R20.1 625,906.9 584.21,866.11 584.21,775.33 588.9,770.65 667.91,770.65 680.26,783 835.83,783 841.83,777 927.62,777 945.81,758.81 990.1,758.81 998.23,766.95 1031.05,766.95 v1(1058,740)
PROC_P: R19.1 U99.24 | length 800.6
  Top Layer w8: v1(1023,740) 1024.25,741.25 1024.25,777.34 U99.24@1024.54,777.63
  Bottom Layer w8: R19.1 436.75,927.72 436.75,907.65 465.79,878.61 465.79,837.02 471.65,831.17 551.83,831.17 566.21,816.79 566.21,767.88 581.44,752.65 675.36,752.65 687.72,765 828.37,765 834.37,759 920.17,759 938.35,740.81 997.55,740.81 1005.69,748.95 1012.31,748.95 1021.26,740 v1(1023,740)
RESET: C18.1 R37.2 RESET1.2 U99.45 | length 160.9
  Bottom Layer w8: R37.2 760,209.47 ; v1(766.24,153.93) 766.24,180.2 760,186.45 760,209.47 ; C18.1 775,224.47 760,209.47
  other v1: 765,261
RXD0: LED2.2 R25.2 U99.40 | length 1499.1
  GND w8: v1(252,875) 252,645.36 387,510.36 387,484.28 375,472.28 375,455.72 401,429.72 401,382.49 413.49,370 472.36,370 503.28,339.07 524.72,339.07 537.64,352 637.32,352 645.32,344 745,344 803,402 ; v1(766,444) 768.3,441.7 784.3,441.7 803,423 803,402 ; v1(1013,149) 983.38,149 979.38,145 943.72,145 803,285.72 803,402
  Bottom Layer w8: R25.2 252,855.53 v1(252,875)
RXD1: R16.2 U99.22 | length 1437.2
  PWR w8: v1(249,544) 249,585.2 211,623.2 211,740.82 202,749.82 202,879.8 297.2,975 692.72,975 721.72,1004 868.65,1004 959,913.65 959,883 1038,804 1062,804 v1(1085,781)
  Bottom Layer w8: R16.2 245,536.75 249,540.75 v1(249,544)
SCL_0: R8.8 U1.2 U10.C1 | length 528.6
  Top Layer w8: U10.C1 299.25,854.75 340,814 363.45,814 383.17,794.28 409.89,794.28 415.75,788.42 415.75,673.05 459.8,629 v1(516,629) 549.56,595.44 566.64,595.44 U1.2
SCL_1: R7.8 U1.4 U11.C1 | length 547.5
  Top Layer w8: U11.C1 215.27,654.48 228.51,667.72 401.28,667.72 496,573 ; v1(515,469) 496,488 496,573 ; U1.4 566.64,556.07 549.34,556.07 532.4,573 496,573
  Bottom Layer w8: v1(515,469) 534.26,469 R7.8
SCL_2: R7.6 U1.6 U16.C1 | length 481
  Top Layer w8: U16.C1 215,467.72 220,472.72 251.52,472.72 267.52,488.72 477.31,488.72 482,484.04 482,473.72 506.72,449 523.28,449 558.77,484.48 558.77,512.89 560.67,514.79 U1.6 535.46,514.79 526.25,524 v1(523,524)
SCL_3: R2.8 U1.8 U17.C1 | length 729.9
  Top Layer w8: U17.C1 223.14,274.75 237.39,289 v1(240,289) ; U1.8 617.38,485.4 617.38,471.25 629.88,458.75 645.25,458.75 679.94,424.06 679.94,413.09 v1@680,413.04
  Bottom Layer w8: v1(240,289) 242.3,286.7 249.01,286.7 263.72,272 280.28,272 292,283.72 292,290.04 296.69,294.72 344.88,294.72 377,326.85 377,366.2 415.8,405 635.72,405 641.72,399 658.28,399 666.59,407.3 678.3,407.3 v1(680,409) 680,458.26 R2.8
SCL_4: R2.6 U1.11 U18.C1 | length 658
  Top Layer w8: U18.C1 388.5,307.5 v1(390,309) ; U1.11 676.43,485.4 676.43,471.25 684.16,463.52 v1(724.52,463.52)
  Bottom Layer w8: v1(390,309) 391,310 391,360.4 421.6,391 629.92,391 635.92,385 684.28,385 724.52,425.24 724.52,509.48 710,524 677.25,524 R2.6
SDA_0: R8.7 U1.1 U10.B1 | length 612.5
  Top Layer w8: U10.B1 255,839 v1(275,819) ; U1.1 560.67,613.21 558.77,615.12 558.77,631.12 556,633.88 556,657 v1(579,680)
  Bottom Layer w8: v1(275,819) 318.72,819 384.72,753 417.01,753 427.01,763 500.49,763 514.49,749 557.69,749 579,727.69 v1(579,680) 575.75,680 562.61,666.85 545.84,666.85 R8.7 534.09,661.01 R8.7@528.25,655.17
SDA_1: R7.7 U1.3 U11.B1 | length 551
  Top Layer w8: U11.B1 v1(385,639) ; v1(505,604) 505.56,604 520.84,588.72 536.48,588.72 549.46,575.75 566.64,575.75 U1.3
  Bottom Layer w8: v1(385,639) 387.3,636.7 402.3,636.7 435,604 v1(505,604) 521.56,587.44 552.98,587.44 567.24,573.18 567.24,510.77 561.39,504.91 559.06,504.91 547.4,493.25 R7.7
SDA_2: R7.5 U1.5 U16.B1 | length 480.8
  Top Layer w8: U16.B1 247.59,449 273.32,474.72 376.84,474.72 381.56,470 385.75,470 391.75,464 v1(395,464) ; v1(522,553) 522.28,553 540.81,534.47 U1.5
  Bottom Layer w8: v1(395,464) 410.31,464 415,468.69 415,469.36 452.76,507.11 452.76,573.18 458.61,579.04 498.39,579.04 505,572.43 505,560.49 510.19,555.3 519.7,555.3 v1(522,553)
SDA_3: R2.7 U1.7 U17.B1 | length 720.6
  Top Layer w8: U17.B1 226.72,259 228.46,260.75 228.94,260.75 237.19,269 248.28,269 271.28,292 v1(272,292) ; U1.7 597.69,485.4 597.69,474.72 599.57,472.84 599.57,454.86 609.69,444.75 634.42,444.75 642.05,437.12 642.05,430.2 650,422.25 v1(650,419)
  Bottom Layer w8: v1(272,292) 288.72,308.72 339.08,308.72 363,332.64 363,372 410,419 v1(650,419) 650,477.95 659.46,487.41 670.65,487.41 R2.7
SDA_4: R2.5 U1.10 U18.B1 | length 767.2
  Top Layer w8: U18.B1 404.25,293.25 v1(420,309) ; U1.10 656.74,485.4 656.74,471.14 708.88,419 v1(745,419)
  Bottom Layer w8: v1(420,309) 406.3,322.7 406.3,355.9 427.4,377 624.12,377 630.12,371 690.08,371 735.79,416.7 742.7,416.7 v1(745,419) 744.52,419.48 744.52,509.28 706.35,547.44 685.29,547.44 R2.5
SIDE_SW1: R29.1 U99.12 | length 120.8
  Bottom Layer w10: R29.1 1285,664 v1(1310,639)
SIDE_SW2: R30.1 U99.13 | length 129.1
  Bottom Layer w10: R30.1 1210.28,708.25 1238.53,680 1291.63,680 1296.14,675.49 1308.51,675.49 v1(1310,674)
TCA_RESET: R9.1 U1.24 U99.25 | length 558
  Top Layer w8: v1(576,646) 593.88,646 595.79,644.09 U1.24
  GND w8: v1(576,646) 613,609 875,609 v1(876,608)
  PWR w8: v1(876,608) 917,649 917,715 983,781 v1(984,781)
TRIG: R8.6 U10.A1 U11.A1 U16.A1 U17.A1 U18.A1 U99.16 | length 2934.9
  Top Layer w8: U16.A1 275.5,433.25 296.25,454 326,454 v1(350,430) ; U11.A1 300.37,623.25 309.63,614 v1(395,614) ; U17.A1 216.5,244 v1(240,244) ; U10.A1 242.46,823.25 271.44,794.28 354.89,794.28 364.25,784.91 364.25,739.75 v1(365,739) ; U18.A1 444.2,299.69 444.2,299.95 450,305.75 v1(450,309) ; U99.16@1292.26,777.63 1292.26,785.5 1305.7,798.95 1305.7,804.7 v1(1308,807)
  GND w8: v1(350,430) 351,429 351,408 v1(450,309) ; v1(365,739) 656,739 706.04,789.04 706.04,795.67 704,797.72 704,814.28 717.72,828 779.14,828 857.14,906 930.28,906 943,893.28 943,872.91 1014.91,801 1128.09,801 1140,812.91 1140,924.31 1144.69,929 1239.28,929 1325,843.28 1325,826.72 v1@1313.28,815
  PWR w8: v1(240,244) 296.72,244 318,265.28 318,279.28 329.72,291 378,291 380,289 428.28,289 431.28,292 433,292 v1(450,309) ; v1(350,430) 351.25,431.25 351.25,452 356.86,457.61 363.61,457.61 373,467 373,592 v1(395,614) 420,639 420,687 368,739 v1(365,739)
  Bottom Layer w8: v1(365,739) 422.81,739 432.81,749 494.69,749 514.25,729.44 514.25,707.06 522.96,698.35 534.16,698.35 R8.6
TXD0: LED1.2 R26.2 U99.39 | length 1691.8
  GND w8: v1(356,932) 353.57,932 325.24,903.67 325.24,834.24 266,775 266,651.15 415,502.15 415,388.69 419.69,384 478.15,384 490.15,372 671.28,372 725,425.72 725,434 v1(766,475) 785.3,455.7 790.09,455.7 824.69,421.11 824.69,409.69 817,402 817,352.36 915.07,254.28 915.07,193.44 919.76,188.76 1001.53,188.76 1033,157.28 1033,135 v1(1014,116)
  Bottom Layer w8: R26.2 322,870.53 322,900.43 353.57,932 v1(356,932)
TXD1: R17.2 U99.21 | length 1514.4
  Top Layer w10: v1(1089,739) 1090.91,740.91 1096.09,740.91 1124.93,769.76 U99.21@1124.93,777.63
  PWR w8: v1(308,542) 308,663.62 216,755.62 216,874 303,961 698.51,961 726.51,989 863.85,989 945,907.85 945,877.2 1032.2,790 1033.28,790 1062.28,761 1082,761 1088.94,754.06 1088.94,739.06 v1(1089,739)
  Bottom Layer w8: R17.2 300,531.77 308,539.77 v1(308,542)
VBAT: C5.2 C6.2 C7.2 C8.2 C21.2 C26.2 IC1.3 JP1.1 Q1.2 R6.1 R32.1 U13.5 | length 1972.6
  Top Layer w10: 866.85,922.23 866.85,932.07 883.25,948.47 883.25,1001.78 R32.1
  Top Layer w28: IC1.3 847.35,913.23 869.73,913.23 885,897.96 v1(885,883) 885,880.57 Q1.2@908.29,857.29
  PWR w10: v1(1167,622) 1216.5,671.5 1216.5,695.5 v1(1266,745) 1228.81,782.19 1228.81,834.19 v3(1192,871)
  PWR w28: v2(585,327) 585,386 620,421 620,431.43 637.57,449 648,449 781,582 781,748 789,756 789,757.43 806.57,775 878.5,775 919,815.5 919,844.5 885,878.5 v1(885,883)
  Bottom Layer w10: v1(885,883) 886.91,881.09 886.91,869.88 953.79,803 1092.7,803 1094.7,801 1160.52,801 1176.78,784.75 1188.78,784.75 C26.2 ; R6.1 1151.22,619.75 1162.04,619.75 1164.29,622 v1(1167,622) ; U13.5 U13.5@1180.17,868.59 ; C26.2@1208,782.47 C26.2 ; v1(1266,745) 1266,763.47 C21.2 C26.2
  Bottom Layer w30: C5.2 500.24,308.29 664.76,308.29 C8.2
VDD: C19.2 C20.2 C24.2 C25.2 C34.2 C35.2 C36.2 C40.2 C41.2 C42.2 D1.2 Q3.3 U10.B2 U10.C2 U11.B2 U11.C2 U16.B2 U16.C2 U17.B2 U17.C2 U18.B2 U18.C2 | length 2680.5
  Top Layer w10: U16.B2 200,449.75 200,474 213.72,487.72 245.3,487.72 251.75,494.17 251.75,498.3 257.61,504.16 269.68,504.16 C40.2 280.47,514 v2(348,514) ; U11.B2 199.25,647.87 199.5,648.12 199.5,666.5 215.72,682.72 308.25,682.72 C20.2 ; U17.B2 200,274.75 200,281.38 196.75,284.63 196.75,343.27 204.7,351.22 253.72,351.22 C41.2 334.53,324.94 C35.2 ; U10.B2 U10.C2 200.11,854.86 200.11,879.58 C19.2 ; U18.B2 395.38,259.75 394.64,260.5 379.61,260.5 360,280.11 360,314 378.72,332.72 418.25,332.72 C42.2
  Top Layer w12: C19.2 C24.2 ; C20.2 C25.2 ; C42.2 C36.2
  PWR w30: v2(297,887) 297,840.84 306,831.84 306,754.16 352.16,708 360,708 v2(375,693) 348,666 v2(348,514) 314,480 314,367 339,342 v1(343,342) 346,345 v2(462,345) 462,340.84 481,321.84 481,275.84 517.84,239 612.91,239 621.91,230 799.5,230 801.5,232 979.09,232 1079,331.91 v2(1079,386)
  Bottom Layer w30: v2(297,887) 297,948.01 D1.2 ; Q3.3 1079,421.02 v2(1079,386)
VIB_CTRL: Q3.1 R39.2 U99.8 | length 532
  Top Layer w8: v1(1004,373) 1038.62,373 1050.62,361 1142,361 1283.04,502.04 U99.8@1333.59,502.04
  Bottom Layer w8: R39.2 940.75,304.75 940.75,340.76 960.38,360.39 960.38,376.39 968.19,384.2 Q3.1
VIN: C13.1 IC3.4 Q1.3 | length 479.6
  Top Layer w8: v2(1070,829) 1093,852 1117.36,852 1132,837.36 1132,826.83 1140.58,818.25 1180.36,818.25 1187.18,825.07 1187.18,837.18 1194,844 C13.1
  Top Layer w28: v5(885,828) 885,824.67 895.88,813.79 1054.25,813.79 v2@1060.7,820.24
  Top Layer w30: Q1.3 1031.18,883 1034.37,879.81 1034.37,846.57 1051.94,829 v2(1070,829)
  Bottom Layer w15: IC3.4 IC3.4@875.63,841.6
VUSB: C2.2 C3.2 C44.2 IC1.4 IC2.5 R13.1 U2.A4B9 U2.B4A9 | length 1184.7
  Top Layer w10: v2(120,1029) 120,1025.45 150.45,995 184.23,995 188.95,990.28 263.17,990.28 267.89,995 338.31,995 432.45,900.85 432.45,864.45 v1(432,864)
  Top Layer w30: C2.2 C3.2 ; v2(619.98,795.65) 610.75,786.41 610.75,769.28 C3.2 ; C44.2 C3.2 ; v2(708,935) 721.72,935 740.32,916.4 IC1.4
  PWR w30: v3(521.39,893.13) 521.39,888.39 497,864 v1(432,864) 500.35,795.65 v2(619.98,795.65) 619.98,844.1 607.54,856.54 607.54,905 637.55,935 v2(708,935)
  Bottom Layer w10: v2(120,1029) R13.1
pads on no net: JP1.0 JP1.0_1 R8.5 U1.12 U1.13 U1.14 U1.15 U1.16 U1.17 U2.A8 U2.B8 U99.7 U99.26 U99.27 U99.28 U99.29 U99.30 U99.31 U99.32 U99.33 U99.34 U99.35 U99.36 U99.37 U99.38 U99.41 U99.44
copper on no net:
  other v4: 1318.9,138.06 59.06,1004.2 1318.9,1004.2

## Polygon pours and split planes (outlines as drawn)
GND on Top Layer "GND_L01_P000" (solid, remove dead copper, pour order 0): 39.37,79 cw(c39.37,118.37) 0,118.37 0,1023.88 cw(c39.37,1023.88) 39.37,1063.25 1338.58,1063.25 cw(c1338.58,1023.88) 1377.95,1023.88 1377.95,118.37 cw(c1338.58,118.37) 1338.58,79
GND on PWR "GND_L03_P002" (solid, remove dead copper, pour order 2): 39.37,79 cw(c39.37,118.37) 0,118.37 0,1023.88 cw(c39.37,1023.88) 39.37,1063.25 1338.58,1063.25 cw(c1338.58,1023.88) 1377.95,1023.88 1377.95,118.37 cw(c1338.58,118.37) 1338.58,79
GND on Bottom Layer "GND_L04_P003" (solid, remove dead copper, pour order 3): 39.37,79 cw(c39.37,118.37) 0,118.37 0,1023.88 cw(c39.37,1023.88) 39.37,1063.25 1338.58,1063.25 cw(c1338.58,1023.88) 1377.95,1023.88 1377.95,118.37 cw(c1338.58,118.37) 1338.58,79
GND on GND "GND_L02_P001" (solid, remove dead copper, pour order 1): 39.37,79 cw(c39.37,118.37) 0,118.37 0,1023.88 cw(c39.37,1023.88) 39.37,1063.25 1338.58,1063.25 cw(c1338.58,1023.88) 1377.95,1023.88 1377.95,118.37 cw(c1338.58,118.37) 1338.58,79

## Keep-outs
Keep-Out Layer:
  the board outline again, w10

## Silkscreen, mask and mechanical layers (free items; w line width, h text height)
Top Overlay:
  text "CHARGE" at 129.38,969.44 h50
  text "PWR" at 760.64,964.64 h50 r90
  text "PWR SW" at 1197.32,887.18 h50
  text "TX" at 946.79,144.25 h50
  text "RESET" at 784.82,94.97 h50
  text "BOOT" at 1117,95.44 h50
  text "RX" at 946.28,88.25 h50
Bottom Overlay:
  drawing of 25 lines, arcs and shapes, not listed
  text "UART0" at 320,879.44 h50
  text "BUS1" at 185.44,714 h50 r270
  text "I2C" at 320,614.44 h50
  text "UART1" at 320,539.44 h50
  text "LEFT   Ver 2.0 / 9 / 10 / 2026" at 1326,466 h45 r90
  text "BUS2" at 185.44,367.15 h50 r270
  text "I2C" at 320,272.59 h50